# Altium PCB MiniEink 1.54寸墨水屏.PcbDoc
Units mil, origin at the board's own origin, x right, y up, seen from the top; angles counter-clockwise.
Board outline 1496.06 x 2362.2 mil, 2 copper layers (Top Layer, Bottom Layer), stack 65.792 mil thick; 102 components, 66 nets, 338 pads, 298 vias.
Unrouted connection lines stored in the file: 1.
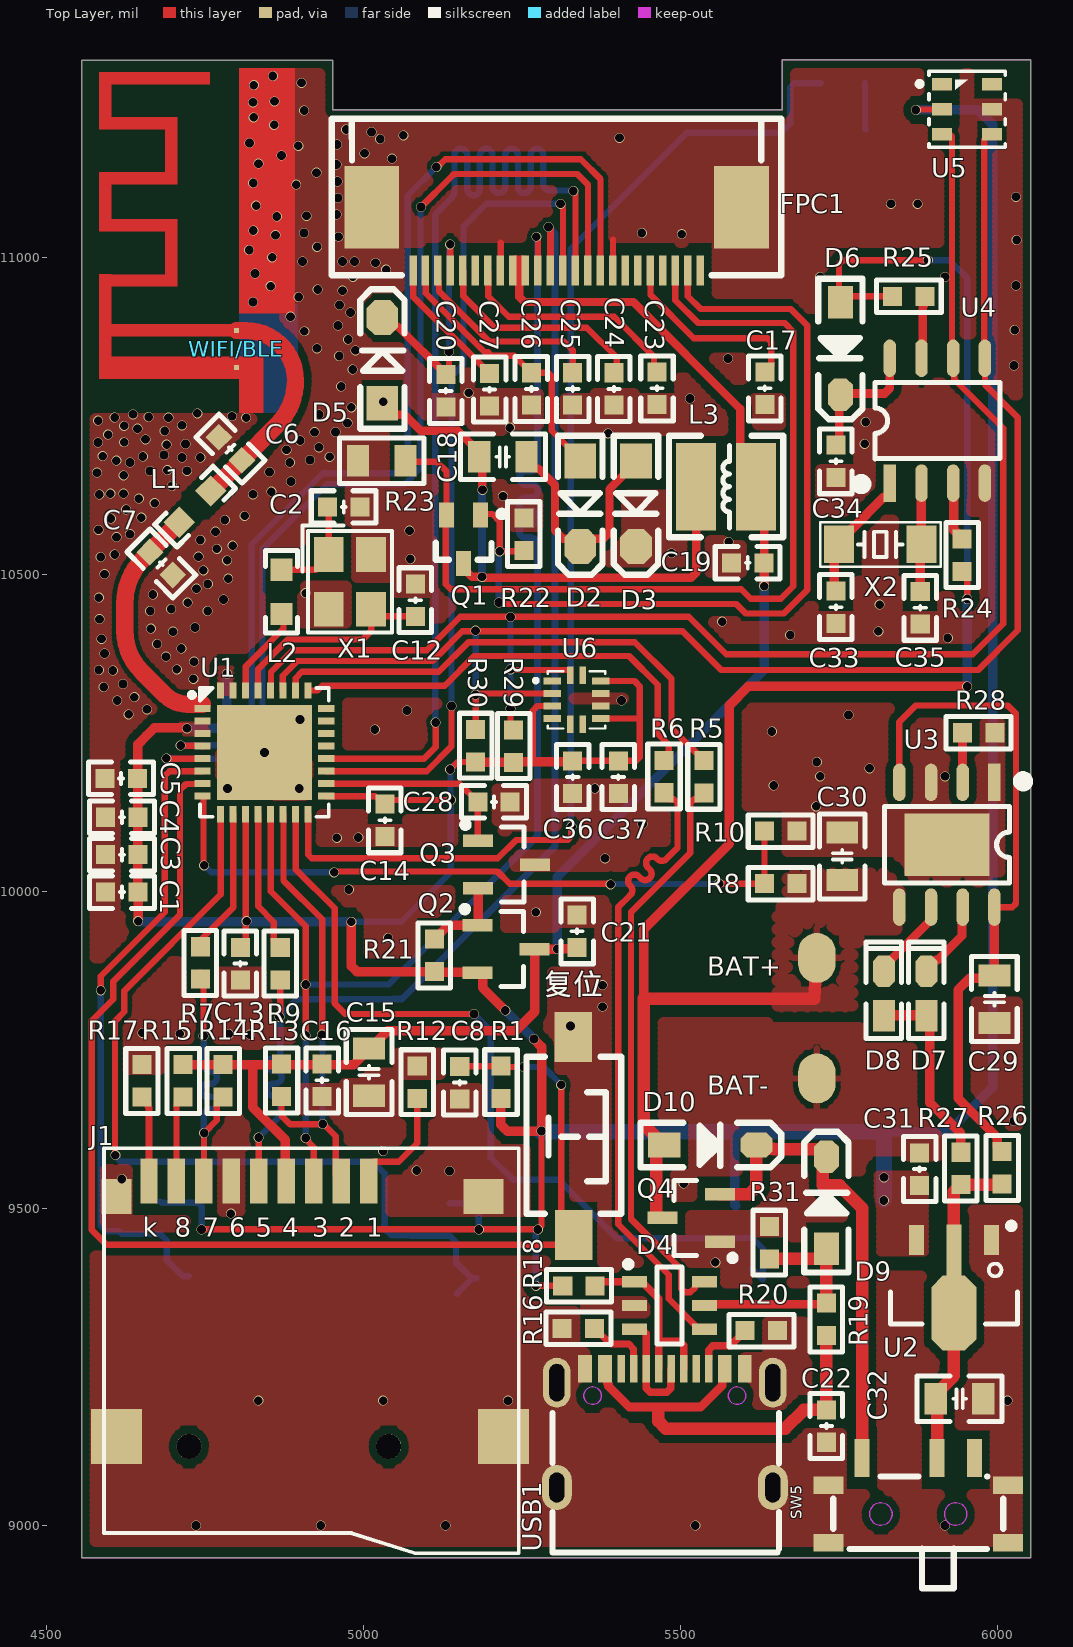
[diagram p0: Top Layer view]
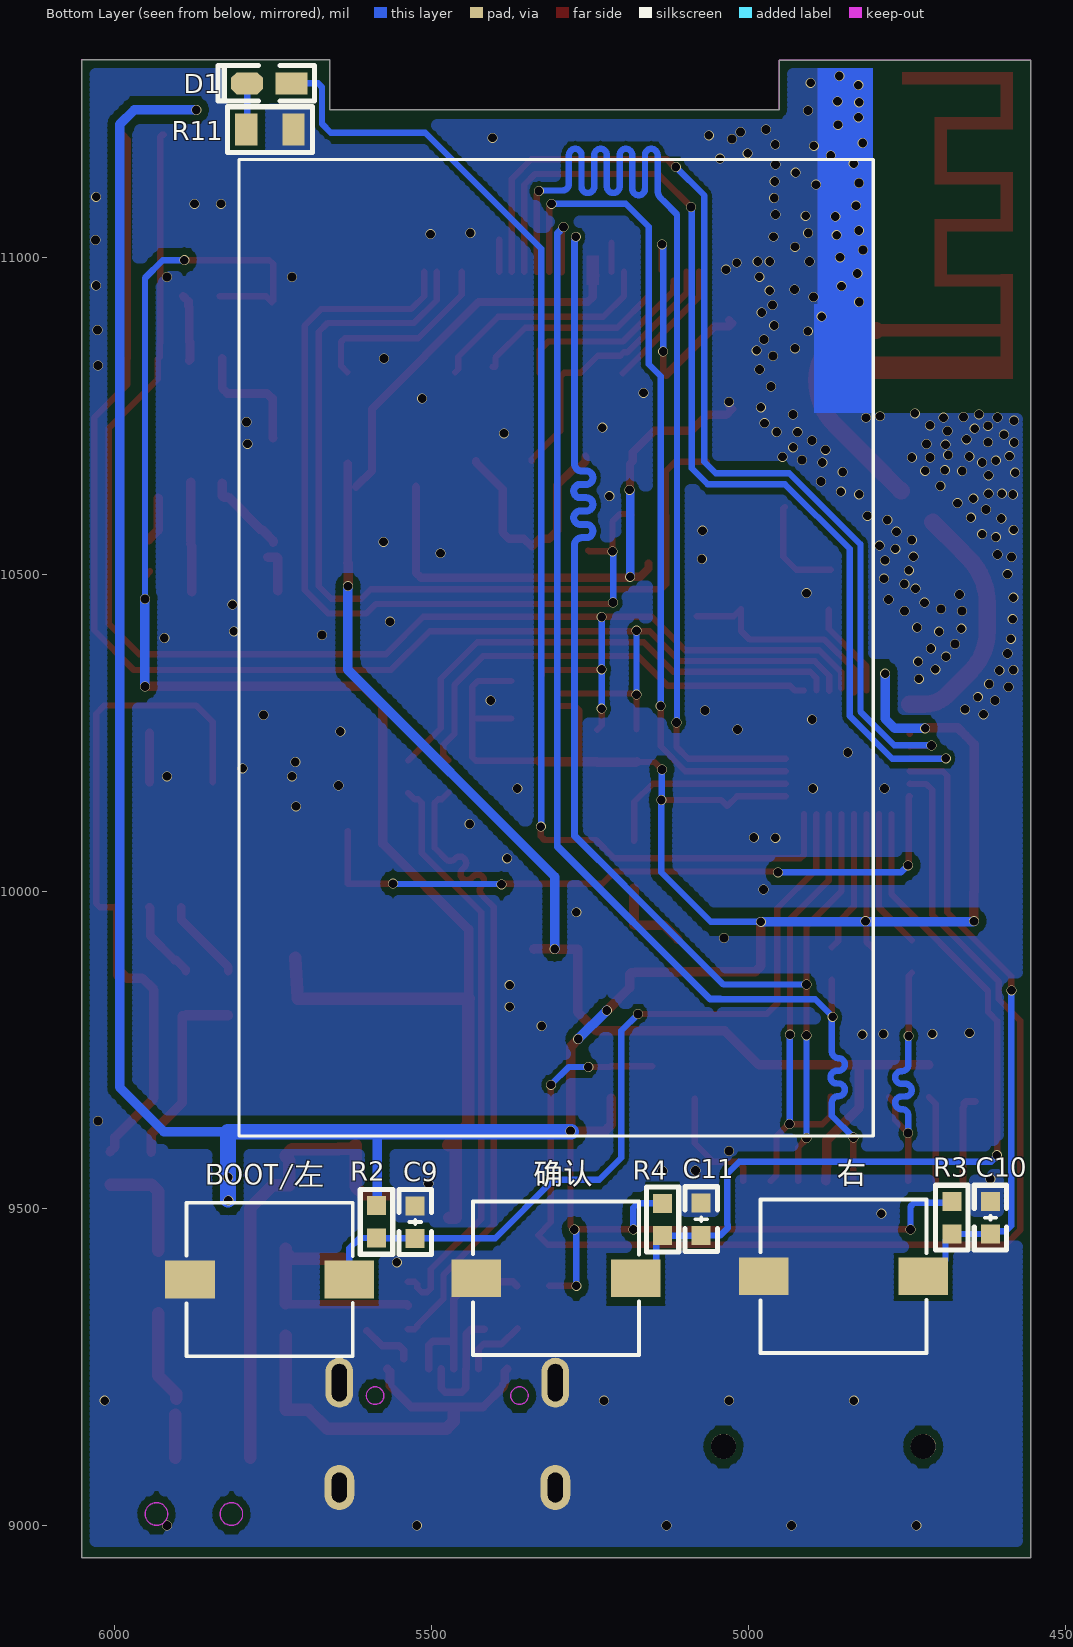
[diagram p1: Bottom Layer view, seen from below]
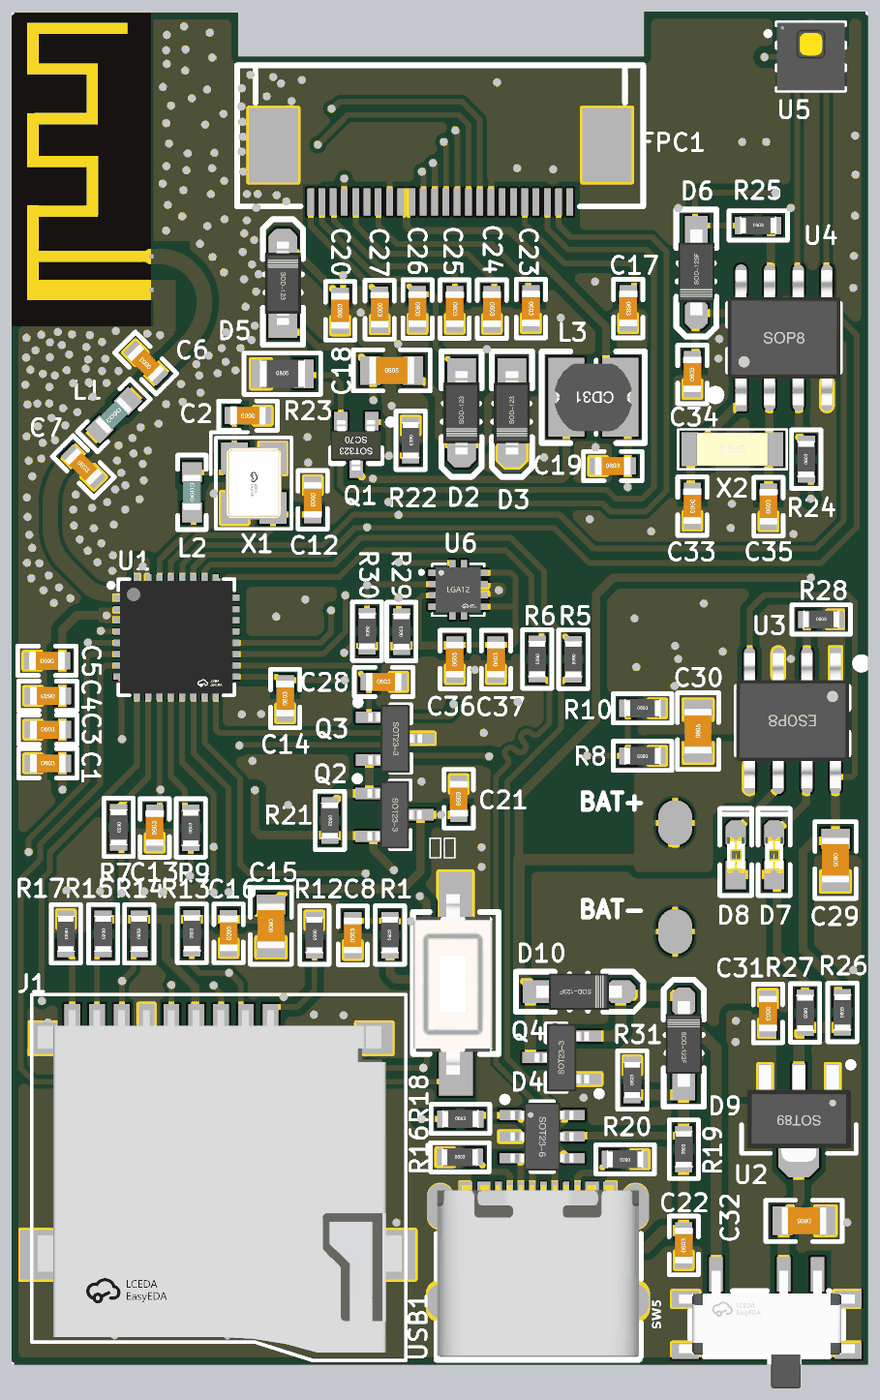
[diagram p2: 3D render of the assembled board from above, using the file's embedded part models]
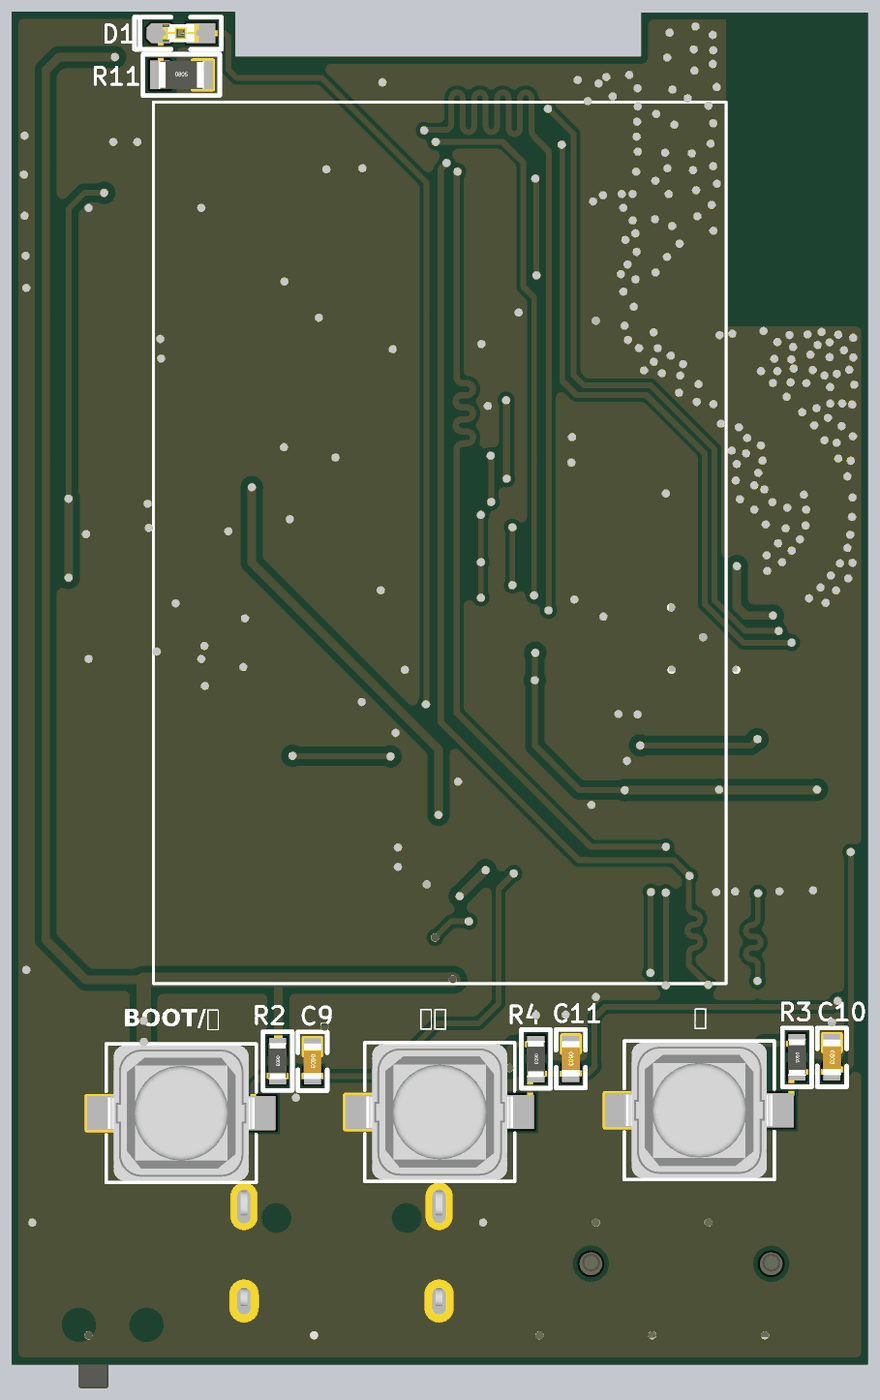
[diagram p3: 3D render of the assembled board from below, using the file's embedded part models]

## Layer stack, top to bottom
Top Solder: solder mask 0.4, Solder Resist, Dk 3.5
Top Layer: signal copper 1.4
Dielectric 1: dielectric 62.9921, FR-4, Dk 4.8
Bottom Layer: signal copper 1.4
Bottom Solder: solder mask 0.4, Solder Resist, Dk 3.5

## Board outline
4555.83,8949.06 4555.83,11310.08 4952.03,11310.08 4952.03,11232.52 5660.69,11232.52 5660.69,11311.26 6051.89,11311.26 6051.89,8949.06

## Design rules (kind name [scope] priority, off if disabled: settings)
Clearance fpc [InNetClass('fpc')] p1: gap=7 ignorepadtopadclearanceinfootprint=TRUE
Clearance usb [InNetClass('usb')] p2: gap=5 ignorepadtopadclearanceinfootprint=TRUE
Clearance esp32 [InNetClass('esp32-c3')] p3: gap=7 ignorepadtopadclearanceinfootprint=TRUE
Clearance typec [InNetClass('type c')] p4: gap=7.01 ignorepadtopadclearanceinfootprint=TRUE
Clearance [All] p5: gap=11.81 ignorepadtopadclearanceinfootprint=TRUE
DiffPairsRouting [InDifferentialPair('USB')] p1: maxlimit=10 minlimit=7 mostfreqgap=10 toplayer_minwidth=3.94 toplayer_maxwidth=15 toplayer_prefwidth=11.81 bottomlayer_minwidth=3.94 bottomlayer_maxwidth=15 bottomlayer_prefwidth=11.81 maxuncoupledlength=500
MatchedLengths [InDifferentialPair('USB')] p1: tolerance=5 checknetsindiffpair=FALSE checkdiffpairvsdiffpair=TRUE checkxsignals=TRUE checkothers=TRUE
PlaneConnect [All] p1: planeconnectstyle=Direct reliefexpansion=20 reliefentries=4 reliefconductorwidth=10 reliefairgap=10
PolygonConnect [All] p1: connectstyle=Direct reliefconductorwidth=10 reliefentries=4 polygonreliefangle="90 Angle" airgapwidth=10
RoutingVias [All] p1: holewidth=28 width=50 viastyle="Through Hole" minholewidth=28 minwidth=50 maxholewidth=28 maxwidth=50
SolderMaskExpansion [All] p1: expansion=4 istentingtop=FALSE
SupplyNets "Schematic Supply Nets_6" [InNet('E3V3')] p1: voltage=0.000
SupplyNets "Schematic Supply Nets_5" [InNet('VOUT')] p2: voltage=0.000
SupplyNets "Schematic Supply Nets_4" [InNet('BAT+')] p3: voltage=0.000
SupplyNets "Schematic Supply Nets_3" [InNet('3V3')] p4: voltage=0.000
SupplyNets "Schematic Supply Nets_2" [InNet('5V_OUT')] p5: voltage=0.000
SupplyNets "Schematic Supply Nets_1" [InNet('5V')] p6: voltage=0.000
SupplyNets "Schematic Supply Nets" [InNet('BAT-')] p7: voltage=0.000
Width [All] p1: maxlimit=78.74 minlimit=3.94 preferedwidth=10
28 further rules are at their usual default settings.

## Classes and differential pairs
net class usb: USB_D+ USB_D-
net class fpc: EPD_BUSY EPD_CS EPD_D/C EPD_RES GDR NetC17_1 NetC23_1 PREVGH PREVGL RESE SPI_MOSI SPI_SCLK VCOM
net class "tf card": E3V3 NetJ1_1 NetJ1_8 NetJ1_9 SPI_CS SPI_MISO SPI_MOSI SPI_SCLK
net class esp32-c3: BOOT EPD_BUSY EPD_CS EPD_D/C EPD_RES IIC_SCL IIC_SDA KEY3 KEY4 LED NetC7_1 NetC12_2 NetL2_1 RST SPI_3V3 SPI_CS SPI_MISO SPI_MOSI SPI_SCLK USB_D+ USB_D-
net class "type c": NetC18_2 NetC22_2 NetD4_1 NetD4_3 NetR16_2
component class 微雪1.54寸墨水屏1: BOOT/左 C1 C2 C3 C4 C5 C6 C7 C8 C9 C10 C11 C12 C13 C14 C16 C17 C19 C20 C22 C23 C24 C26 C28 C29 C31 C32 C33 C35 C37 D1 D2 D3 D4 D5 D6 D7 D8 D9 D10 FPC1 J1 L1 L2 L3 Q1 Q2 Q3 Q4 R1 R2 R3 R4 R5 R6 R7 R8 R9 R10 R11 R12 R13 R14 R15 R16 R17 R18 R19 R20 R21 R22 R23 R24 R25 R26 R27 R28 R29 R30 R31 SW5 U1 U2 U3 U4 U5 U6 USB1 WIFI/BLE X1 X2 右 复位 确认
differential pair USB_1: +NetR6_1 -NetR5_1
differential pair USB: +USB_D+ -USB_D-

## Components (designator, comment, footprint, x,y, rotation, side; value= is the part's Value field where it differs from the comment)
BOOT/左 "3x6x5" SW-SMD_L6.0-W6.0-LS6.6 5755.37,9388 r180 bottom (schematic designator SW2)
C1 "1uf/50V" "C 0603_L" 4619.41,9998.75 r0 top
C2 "20pF" "C 0603_L" 4969,10606 r180 top
C3 "0.1uf/50V" "C 0603_L" 4619.41,10057.75 r0 top
C4 "1uf/50V" "C 0603_L" 4619.41,10116.75 r180 top
C5 "0.1uf/50V" "C 0603_L" 4618,10178 r180 top
C6 "1pf" "C 0603_L" 4790.49,10697.84 r135 top
C7 "1pf" "C 0603_L" 4681.59,10516.82 r315 top
C8 "0.1uf/50V" "C 0603_L" 5152,9698.41 r90 top value=0.1uf
C9 "0.1uf/50V" "C 0603_L" 5526,9478.59 r270 bottom value=0.1uf
C10 "0.1uf/50V" "C 0603_L" 4619,9485.37 r270 bottom value=0.1uf
C11 "0.1uf/50V" "C 0603_L" 5075,9483 r270 bottom value=0.1uf
C12 "20pF" "C 0603_L" 5082,10459 r270 top
C13 "0.1uf/50V" "C 0603_L" 4806,9886 r90 top
C14 "0.1uf/50V" "C 0603_L" 5034,10112 r90 top
C15 "10uf/50V" "C 0805_L" 5009,9715 r270 top
C16 "0.1uf/50V" "C 0603_L" 4935,9702 r270 top
C17 "0.1uf/50V" "C 0603_L" 5633,10793 r270 top
C18 "104" "C 0805_L" 5220,10685 r0 top
C19 "0.1uf/50V" "C 0603_L" 5606,10518 r0 top
C20 "0.1uf/50V" "C 0603_L" 5130,10789 r90 top
C21 "0.1uf/50V" "C 0603_L" 5337,9937 r90 top
C22 "0.1uf/50V" "C 0603_L" 5730,9157 r90 top
C23 "0.1uf/50V" "C 0603_L" 5463,10793 r270 top
C24 "0.1uf/50V" "C 0603_L" 5395,10792 r270 top
C25 "0.1uf/50V" "C 0603_L" 5330,10792 r270 top
C26 "0.1uf/50V" "C 0603_L" 5265,10792 r270 top
C27 "0.1uf/50V" "C 0603_L" 5199,10791 r270 top
C28 "0.1uf/50V" "C 0603_L" 5206,10141 r0 top
C29 "10uf/50V" "C 0805_L" 5995,9830 r270 top
C30 "10uf/50V" "C 0805_L" 5755,10055.12 r90 top
C31 "0.1uf/50V" "C 0603_L" 5877,9562 r270 top
C32 "10uf/50V" "C 0805_L" 5940,9200 r180 top
C33 "12pF" "C 0603_L" 5745,10448 r270 top
C34 "0.1uf/50V" "C 0603_L" 5745,10678 r90 top
C35 "12pF" "C 0603_L" 5878,10447 r90 top
C36 "0.1uf" "C 0603_L" 5330,10180 r90 top
C37 "0.1uf" "C 0603_L" 5402,10180 r90 top
D1 "LED" "LED 0603R" 5756,11274 r0 bottom
D2 "MBR0530" SOD-123 5342,10611 r270 top
D3 "MBR0530" SOD-123 5430,10611 r270 top
D4 "USBLC6-2SC6" SOT23-6L 5482.57,9347.05 r270 top
D5 "MBR0530" SOD-123 5030,10837 r90 top
D6 "SS14" SOD-123F 5752,10856 r270 top
D7 "LED" "LED 0603R" 5888,9839 r90 top
D8 "LED" "LED 0603G" 5821,9839 r90 top
D9 "SS14" SOD-123F 5730,9509 r90 top
D10 "SS14" SOD-123F 5547,9600 r0 top
FPC1 "FPC-05F-24PH20" AFC07-S24ECA-00 5304.7,11028.8 r180 top
J1 "TF_Card" "Micro SD 3D" 4882.52,9125 r0 top
L1 "2nH" "L 0603" 4734.63,10606.63 r225 top
L2 "24nH" "L 0603" 4871,10472 r90 top
L3 "10uH" CD31 5572,10638 r180 top
Q1 "Si1308" SOT323 5158,10555 r180 top
Q2 "AO3401A" SOT23-3N 5225,9909 r270 top
Q3 "AO3400A" SOT23-3N 5226,10042 r270 top
Q4 "AO3401A" SOT23-3N 5517,9485 r90 top
R1 "10K" "R 0603_L" 5217,9699 r90 top value=1K
R2 "10K" "R 0603_L" 5587,9479 r270 bottom value=1K
R3 "10K" "R 0603_L" 4680,9485.37 r270 bottom value=1K
R4 "10K" "R 0603_L" 5136,9482.59 r270 bottom value=1K
R5 "22Ω" "R 0603_L" 5537,10180.59 r270 top
R6 "22Ω" "R 0603_L" 5474,10181 r270 top
R7 "22Ω" "R 0603_L" 4743,9887 r270 top
R8 "100K" "R 0603_L" 5658,10012 r180 top value=1K
R9 "22Ω" "R 0603_L" 4869,9886 r90 top
R10 "100K" "R 0603_L" 5658,10095 r0 top value=1K
R11 "1K" "R 0805_L" 5755,11201 r180 bottom
R12 "10K" "R 0603_L" 5085,9699 r270 top
R13 "10K" "R 0603_L" 4871,9702 r90 top
R14 "10K" "R 0603_L" 4779,9701 r90 top
R15 "10K" "R 0603_L" 4716,9701 r270 top
R16 "5.1K" "R 0603_L" 5339,9311 r0 top value=1K
R17 "10K" "R 0603_L" 4651,9701 r270 top
R18 "1.5K" "R 0603_L" 5340,9378 r0 top value=1K
R19 "0R" "R 0603_L" 5730,9325 r90 top value=1K
R20 "5.1K" "R 0603_L" 5627.55,9307.38 r180 top value=1K
R21 "10K" "R 0603_L" 5112,9899 r270 top
R22 "10K" "R 0603_L" 5253,10563 r270 top
R23 "3R" "R 0805_L" 5029,10679 r0 top
R24 "10K" "R 0603_L" 5944,10530 r90 top value=1K
R25 "10K" "R 0603_L" 5860,10938 r0 top value=1K
R26 "0.2R" "R 0603_L" 6007,9564 r90 top value=1K
R27 "1K" "R 0603_L" 5942,9563 r270 top
R28 "2K" "R 0603_L" 5970,10250 r0 top value=1K
R29 "4.7K" "R 0603_L" 5237,10229 r90 top value=1K
R30 "4.7K" "R 0603_L" 5177,10229.59 r270 top value=1K
R31 "10K" "R 0603_L" 5640,9446 r90 top value=1K
SW5 "MSK12C02" SW-TH_MSK12C02 5875,9040 r0 top
U1 "ESP32-C3FH4" QFN-32_L5.0-W5.0-P0.50-TL-EP3.7 4844,10219 r0 top
U2 "ht7833-a" SOT89_L 5931,9438 r180 top
U3 "TP4056" ESOP8_L 5920,10073.43 r270 top
U4 "BM8563ESA_C269877" SOP8_L 5905,10742 r90 top
U5 "AHT20" SENSOR-SMD_L3.0-W3.0-P1.00-BR 5952,11233 r180 top
U6 "SC7A20HTR" LGA-12_L2.0-W2.0-P0.50-TL 5336,10302 r0 top
USB1 "TYPE-C 16PIN 2MD(073)" USB-C-SMD_TYPE-C-16PIN-2MD-073 5475.3,9153.5 r0 top
WIFI/BLE "ANT2" (my)ANT-F-1-2.4G-1.6mmFR4-WCH 4800,10884 r270 top (schematic designator ANT1)
X1 "XL2EL89CPI-111YLC-40M" SMD3225-4P 4979,10488 r270 top
X2 "32.768kHz" "OSC 3215-2P" 5815,10547 r0 top
右 "3x6x5" SW-SMD_L6.0-W6.0-LS6.6 4850.63,9393 r180 bottom (schematic designator SW3)
复位 "3x6x5" "TSW SMD-3*6*2.5" 5332,9613 r270 top (schematic designator SW1)
确认 "3x6x5" SW-SMD_L6.0-W6.0-LS6.6 5304,9390 r180 bottom (schematic designator SW4)

## Footprints (in the part's own frame and the unit in brackets; to place one, negate y for a bottom-side part, rotate by r counter-clockwise, add the part's x,y. Pads: shape width x height; smd on the part's side, far side on the other; paste and mask are expansions set on the pad)
(my)ANT-F-1-2.4G-1.6mmFR4-WCH [mm]
  rect 0.2x0.2 smd mask+0: 0(1.483,0) 1(0,0)
  Top Layer region: -1.757,-2.361 -2.257,-2.361 -2.257,-5.181 -1.757,-5.181
  Top Layer region: -5.86,-2.361 -6.36,-2.361 -6.36,-5.181 -5.86,-5.181
  Top Layer region: -5.872,-2.361 -8.361,-2.361 -8.361,-2.861 -5.872,-2.861
  Top Layer region: -8.06,-2.361 -8.56,-2.361 -8.56,-5.181 -8.06,-5.181
  Top Layer region: -9.86,-1.06 -10.36,-1.06 -10.36,-5.18 -9.86,-5.18
  Top Layer region: -8.06,-5 -10.36,-5 -10.36,-5.5 -8.06,-5.5
  Top Layer region: -3.96,-5 -6.36,-5 -6.36,-5.5 -3.96,-5.5
  Top Layer region: -3.96,-2.36 -4.46,-2.36 -4.46,-5.18 -3.96,-5.18
  Top Layer region: -1.85,-2.36 -4.39,-2.36 -4.39,-2.855 -1.85,-2.855
  Top Layer region: 1.94,-5 -2.26,-5 -2.26,-5.5 1.94,-5.5
  Top Layer region: 1.94,0.1 1.04,0.1 1.04,-5.206 1.94,-5.206
  Top Layer region: 0.24,0.1 -0.26,0.1 -0.26,-5.231 0.24,-5.231
AFC07-S24ECA-00 [mil] "上接 抽屉式"
  rect 11.8x47.2 smd: 1(-226.3,49.8) 2(-206.6,49.8) 3(-186.9,49.8) 4(-167.3,49.8) 5(-147.6,49.8) 6(-127.9,49.8) 7(-108.2,49.8) 8(-88.5,49.8) 9(-68.8,49.8) 10(-49.2,49.8) 11(-29.5,49.8) 12(-9.8,49.8) 13(9.9,49.8) 14(29.6,49.8) 15(49.3,49.8) 16(69,49.8) 17(88.6,49.8) 18(108.3,49.8) 19(128,49.8) 20(147.7,49.8) 21(167.4,49.8) 22(187.1,49.8) 23(206.8,49.8) 24(226.4,49.8)
  rect 86.6x129.9 smd: 25(-291.3,-49.9) 26(291.4,-49.6)
  silkscreen extent -354,-189 354,58
"C 0603_L" [mil] "无极性贴片电容                                       淘宝ID:黄晶宝石"
  rect 30x30 smd: 1(-25.59,0) 2(25.59,0)
  silkscreen extent -51,-26 51,26, body extent -31,-16 31,16, height 32
"C 0805_L" [mil] "无极性贴片电容                                        淘宝ID:黄晶宝石"
  rect 35x50 smd: 1(-37.4,0) 2(37.4,0)
  silkscreen extent -67,-36 67,36, body extent -39,-24 39,24, height 20
CD31 [mm] "3.5*3*1mm（长宽高）        淘宝ID:黄晶宝石"
  rect 1.6x3.5 smd: 1(-1.2,0) 2(1.2,0)
  silkscreen extent -2.29,-2.03 2.29,2.03, body extent -1.72,-1.5 1.72,1.5, height 1.2
ESOP8_L [mm] "5*6*1.8mm（长宽高） 封装库来自淘宝卖家 ID：黄晶宝石"
  rect 1.5x0.5 smd: 1(-2.5,1.905)
  oval 1.5x0.5 smd: 2(-2.5,0.635) 3(-2.5,-0.635) 4(-2.5,-1.905) 5(2.5,-1.905) 6(2.5,-0.635) 7(2.5,0.635) 8(2.5,1.905)
  rect 2.5x3.4 smd paste-2: 9(0,0)
  rect 0.9x0.7 on Top Paste: 10(-0.625,1.1) 10(-0.625,0) 10(-0.625,-1.1) 11(0.65,1.1) 11(0.65,0) 11(0.65,-1.1)
  silkscreen extent -2.69,-2.5 1.52,3.2, body extent -3,-2.5 3,2.5, height 1.53
"L 0603" [mil] "小功率贴片电感        淘宝ID:黄晶宝石"
  rect 35x35 smd: 1(-35,0) 2(35,0)
  silkscreen extent -65,-25 65,25, body extent -31,-16 31,16, height 31
"LED 0603G" [mil] "绿色0603LED                                   淘宝ID:黄晶宝石"
  rect 50x35 smd: 1(-35,0.26)
  oct 50x35 smd: 2(35,0.26)
  silkscreen extent -71,-28 81,28, body extent -31,-16 32,16, height 18
"LED 0603R" [mil] "红色0603LED                                           淘宝ID:黄晶宝石"
  rect 50x35 smd: 1(-35,0.26)
  oct 50x35 smd: 2(35,0.26)
  silkscreen extent -71,-28 81,28, body extent -31,-16 31,16, height 24
LGA-12_L2.0-W2.0-P0.50-TL [mil]
  rect 27.6x11 smd: 1(-38.4,29.5) 2(-38.4,9.8) 3(-38.4,-9.9) 4(-38.4,-29.6) 7(38.4,-29.6) 8(38.4,-9.9) 9(38.4,9.8) 10(38.4,29.5)
  rect 11x27.6 smd: 5(-9.8,-38.4) 6(9.9,-38.4) 11(9.9,38.3) 12(-9.8,38.3)
  silkscreen extent -67,-45 46,45, body extent -39,-39 39,39, height 40
"Micro SD 3D" [mm] "淘宝ID:黄晶宝石"
  round 1 hole 1 unplated: 0(-4,0) 0(4,0)
  rect 0.7x1.8 smd: 1(3.2,10.627) 2(2.1,10.627) 3(1,10.627) 4(-0.1,10.627) 5(-1.2,10.627) 6(-2.3,10.627) 7(-3.4,10.627) 8(-4.5,10.627) 9(-5.6,10.627)
  rect 2.032x2.2 smd: 10(-6.9,0.4) 10(8.6,0.4)
  rect 1.2x1.4 smd: 10(-6.9,10)
  rect 1.6x1.4 smd: 10(7.8,10)
  silkscreen extent -7.4,-4.28 9.2,11.94, body extent -7.14,-3.95 9.01,11.25, height 2.05
"OSC 3215-2P" [mm] "3.2*1.5*0.6mm(长宽高)                      淘宝ID:黄晶宝石"
  rect 1.2x1.5 smd: 1(-1.65,0) 2(1.65,0)
  silkscreen extent -2.41,-0.89 2.41,0.89, body extent -1.6,-0.75 1.6,0.75, height 0.61
QFN-32_L5.0-W5.0-P0.50-TL-EP3.7 [mil]
  rect 25.6x11 smd paste-3937 mask+2: 1(-97.5,68.9) 2(-97.5,49.2) 3(-97.5,29.6) 4(-97.5,9.9) 5(-97.5,-9.8) 6(-97.5,-29.5) 7(-97.5,-49.2) 8(-97.5,-68.9) 17(97.5,-68.9) 18(97.5,-49.2) 19(97.5,-29.5) 20(97.5,-9.8) 21(97.5,9.9) 22(97.5,29.6) 23(97.5,49.2) 24(97.5,68.9)
  rect 11x25.6 smd paste-3937 mask+2: 9(-68.9,-97.5) 10(-49.2,-97.5) 11(-29.5,-97.5) 12(-9.8,-97.5) 13(9.8,-97.5) 14(29.5,-97.5) 15(49.2,-97.5) 16(68.9,-97.5) 25(68.9,97.6) 26(49.2,97.6) 27(29.5,97.6) 28(9.8,97.6) 29(-9.8,97.6) 30(-29.5,97.6) 31(-49.2,97.6) 32(-68.9,97.6)
  rect 149.6x149.6 smd paste-3937 mask+2: 33(0,0)
  silkscreen extent -118,-101 101,102, body extent -98,-98 98,98, height 36
"R 0603_L" [mil] "1/10W贴片电阻                 淘宝ID:黄晶宝石"
  rect 30x30 smd: 1(-25.59,0) 2(25.59,0)
  silkscreen extent -51,-26 51,26, body extent -31,-16 31,16, height 16
"R 0805_L" [mil] "1/8W贴片电阻"
  rect 35x50 smd: 1(-37.4,0) 2(37.4,0)
  silkscreen extent -67,-36 67,36, body extent -39,-25 39,25, height 20
SENSOR-SMD_L3.0-W3.0-P1.00-BR [mil]
  rect 31.5x19.7 smd paste+0 mask+2: 1(39.4,-39.4) 2(39.4,0) 3(39.4,39.4) 4(-39.4,39.4) 5(-39.4,0) 6(-39.4,-39.4)
  silkscreen extent -60,-60 79,60, body extent -59,-59 59,59, height 31
SMD3225-4P [mil]
  rect 55.1x47.2 smd: 1(-43.3,-33.5) 2(43.3,-33.5) 3(43.3,33.4) 4(-43.3,33.4)
  silkscreen extent -89,-75 80,66, body extent -63,-49 63,49, height 28
SOD-123 [mil] "2.7x1.6X1.1mm（长宽高，不包括引脚） 淘宝ID:黄晶宝石"
  rect 55x50 smd: 1(-67.5,0)
  oct 55x50 smd: 2(67.5,0)
  silkscreen extent -108,-35 112,35, body extent -73,-31 73,31, height 48
SOD-123F [mm] "2.7x1.6X1.1mm（长宽高，不包括引脚）"
  rect 1.3x1 smd: 1(-1.85,0)
  oct 1.3x1 smd: 2(1.85,0)
  silkscreen extent -2.79,-0.89 2.84,0.89, body extent -1.9,-0.8 1.9,0.8, height 1.15
SOP8_L [mm] "5*6*1.8mm（长宽高）封装库来自淘宝卖家 ID：黄晶宝石"
  rect 1.5x0.5 smd: 1(-2.5,1.905)
  oval 1.5x0.5 smd: 2(-2.5,0.635) 3(-2.5,-0.635) 4(-2.5,-1.905) 5(2.5,-1.905) 6(2.5,-0.635) 7(2.5,0.635) 8(2.5,1.905)
  silkscreen extent -2.69,-2.5 1.52,3.2, body extent -3,-2.5 3,2.5, height 1.9
SOT23-3N [mm] "3x1.3x1mm(长宽高)    封装库来自淘宝卖家 ID：黄晶宝石"
  rect 0.5x1.2 smd: 1(-0.95,-1.143) 2(0.95,-1.143) 3(0,1.143)
  silkscreen extent -1.72,-1.78 1.5,0.7, body extent -1.5,-1.2 1.5,1.2, height 1.05
SOT23-6L [mm] "3x1.6x1.1mm(长宽高) 封装库来自淘宝卖家 ID：黄晶宝石"
  rect 0.45x1 smd: 1(-0.95,-1.397) 2(0,-1.397) 3(0.95,-1.397) 4(0.95,1.397) 5(0,1.397) 6(-0.95,1.397)
  silkscreen extent -1.77,-1.78 1.55,0.51, body extent -1.5,-1.4 1.5,1.4, height 1.15
SOT89_L [mm] "4.6x4.3x1.6mm(长宽高)"
  rect 0.6x1.2 smd: 1(-1.5,-0.303) 3(1.5,-0.303)
  oct 1.8x3 smd: 2(0,2.616)
  rect 0.6x2.1 smd: 2(0,0.127)
  silkscreen extent -2.54,-1 2.54,3.05, body extent -2.3,-0.88 2.3,3.42, height 1.6
SOT323 [mm] "封装库来自淘宝卖家 ID：黄晶宝石"
  rect 0.6x1 smd: 1(-0.686,-0.965) 2(0.686,-0.965) 3(0,0.965)
  silkscreen extent -1.65,-1.14 1.12,0.81, body extent -1.09,-1.1 1.11,1.15, height 1.1
SW-SMD_L6.0-W6.0-LS6.6 [mil] "硅胶按键开关"
  rect 78.2x59.5 smd: 1(-125.7,0) 2(125.7,0)
  silkscreen extent -131,-121 131,121, body extent -128,-118 128,118, height 213
SW-TH_MSK12C02 [mil]
  rect 23.6x60 smd: 1(-88.6,66.9) 2(29.5,66.9) 3(88.5,66.9)
  rect 47.2x27.6 smd: 4(-141.8,-67) 4(-141.8,23.6) 4(141.7,-67) 4(141.7,23.6)
  Keep-Out Layer circle w0.1: c-59.1,-21.7 r17.7
  Keep-Out Layer circle w0.1: c59,-21.7 r17.7
  Keep-Out Layer region: -41.4,-21.7 -41.4,-25.22 -44.09,-31.73 -49.07,-36.71 -55.58,-39.4 -62.62,-39.4 -69.13,-36.71 -74.11,-31.73 -76.8,-25.22 -76.8,-21.7 -76.8,-18.18 -74.11,-11.67 -69.13,-6.69 -62.62,-4 -55.58,-4 -49.07,-6.69 -44.09,-11.67 -41.4,-18.18 -41.4,-21.7 -41.4,-21.7
  Keep-Out Layer region: -41.4,-21.7 -41.4,-25.22 -44.09,-31.73 -49.07,-36.71 -55.58,-39.4 -62.62,-39.4 -69.13,-36.71 -74.11,-31.73 -76.8,-25.22 -76.8,-21.7 -76.8,-18.18 -74.11,-11.67 -69.13,-6.69 -62.62,-4 -55.58,-4 -49.07,-6.69 -44.09,-11.67 -41.4,-18.18 -41.4,-21.7 -41.4,-21.7
  Keep-Out Layer region: 76.7,-21.7 76.7,-25.22 74.01,-31.73 69.03,-36.71 62.52,-39.4 55.48,-39.4 48.97,-36.71 43.99,-31.73 41.3,-25.22 41.3,-21.7 41.3,-18.18 43.99,-11.67 48.97,-6.69 55.48,-4 62.52,-4 69.03,-6.69 74.01,-11.67 76.7,-18.18 76.7,-21.7 76.7,-21.7
  Keep-Out Layer region: 76.7,-21.7 76.7,-25.22 74.01,-31.73 69.03,-36.71 62.52,-39.4 55.48,-39.4 48.97,-36.71 43.99,-31.73 41.3,-25.22 41.3,-21.7 41.3,-18.18 43.99,-11.67 48.97,-6.69 55.48,-4 62.52,-4 69.03,-6.69 74.01,-11.67 76.7,-18.18 76.7,-21.7 76.7,-21.7
  silkscreen extent -134,-139 134,37, body extent -154,-132 154,73, height 59
"TSW SMD-3*6*2.5" [mm] "3*6*2.5mm"
  rect 2x1.5 smd: 1(-3.996,-0.02) 2(3.937,0)
  silkscreen extent -3.21,-1.9 3.09,1.9, body extent -4,-1.88 4,1.62, height 2.59
USB-C-SMD_TYPE-C-16PIN-2MD-073 [mil]
  oval 47.2x70.9 hole 23.6 slot 47.2 at 90 deg paste-99999 mask+2: 13(-170.3,-93.5) 14(170.3,-93.5)
  oval 43.3x78.7 hole 23.6 slot 59.1 at 90 deg paste-99999 mask+2: 13(-170.3,71.8) 14(170.3,71.8)
  rect 21.7x43.3 smd paste-3937 mask+2: A1B12(-126,93.5) A4B9(-94.5,93.5) B1A12(126,93.5) B4A9(94.5,93.5)
  rect 11.8x43.3 smd paste-3937 mask+2: A5(-49.2,93.5) A6(-9.8,93.5) A7(9.8,93.5) A8(49.2,93.5) B5(68.9,93.5) B6(29.5,93.5) B7(-29.5,93.5) B8(-68.9,93.5)
  Keep-Out Layer circle w0.1: c113.8,51.4 r13.8
  Keep-Out Layer circle w0.1: c-113.8,51.4 r13.8
  Keep-Out Layer region: 127.6,51.4 127.6,48.66 125.5,43.58 121.62,39.7 116.54,37.6 111.05,37.6 105.98,39.7 102.1,43.58 100,48.66 100,51.4 100,54.14 102.1,59.22 105.98,63.1 111.05,65.2 116.54,65.2 121.62,63.1 125.5,59.22 127.6,54.14 127.6,51.4 127.6,51.4
  Keep-Out Layer region: 127.6,51.4 127.6,48.66 125.5,43.58 121.62,39.7 116.54,37.6 111.05,37.6 105.98,39.7 102.1,43.58 100,48.66 100,51.4 100,54.14 102.1,59.22 105.98,63.1 111.05,65.2 116.54,65.2 121.62,63.1 125.5,59.22 127.6,54.14 127.6,51.4 127.6,51.4
  Keep-Out Layer region: -100,51.4 -100,48.66 -102.1,43.58 -105.98,39.7 -111.06,37.6 -116.55,37.6 -121.62,39.7 -125.5,43.58 -127.6,48.66 -127.6,51.4 -127.6,54.14 -125.5,59.22 -121.62,63.1 -116.55,65.2 -111.06,65.2 -105.98,63.1 -102.1,59.22 -100,54.14 -100,51.4 -100,51.4
  Keep-Out Layer region: -100,51.4 -100,48.66 -102.1,43.58 -105.98,39.7 -111.06,37.6 -116.55,37.6 -121.62,39.7 -125.5,43.58 -127.6,48.66 -127.6,51.4 -127.6,54.14 -125.5,59.22 -121.62,63.1 -116.55,65.2 -111.06,65.2 -105.98,63.1 -102.1,59.22 -100,54.14 -100,51.4 -100,51.4
  silkscreen extent -177,-196 180,24, body extent -176,-189 176,109, height 127

## Part data
BOOT/左 右 复位 确认: library part "TSW 3x6", "30105201 3×6×2.5轻触开关（贴片加边带）", BOM名称=3x6轻触开关, 学习资源=https://shop463601444.taobao.com, 版权归属="封装库来自淘宝 ID：黄晶宝石"
C1 C3 C4 C5 C6 C7 C13 C14: library part CBB, "3010200396  (y)50V-474K电容/贴片/SMD0603", BOM名称=CBB电容, 淘宝ID="封装库来自淘宝 ID：黄晶宝石", 联系售后=https://shop463601444.taobao.com
C2 C12 C18 C33 C35 C36 C37: library part C, "贴片电容", BOM名称=无极性贴片电容, 唯一出售店铺网址=https://shop463601444.taobao.com, 淘宝ID="封装库来自淘宝 ID：黄晶宝石", 联系售后，技术支持=https://shop463601444.taobao.com
C8 C9 C10 C11: library part Capacitor, "Capacitor", SimulationGenericComponent=True
C15 C16 C17 C19 C20 C21 C22 C23 C24 C25 C26 C27 C28 C29 C30 C31 C34: library part CBB, "CBB电容", BOM名称=CBB电容, 淘宝ID="封装库来自淘宝 ID：黄晶宝石", 联系售后=https://shop463601444.taobao.com
C32: library part CBB, "3010200430 (y)25V-106K电容/贴片/SMD0603", BOM名称=CBB电容, 淘宝ID="封装库来自淘宝 ID：黄晶宝石", 联系售后=https://shop463601444.taobao.com
D1 D7 D8: "发光二极管", 技术支持，联系售后=https://shop463601444.taobao.com
D2 D3 D5: library part M7, "整流二极管", BOM名称=整流二极管, 学习资源=https://shop463601444.taobao.com, 版权归属="封装库来自淘宝 ID：黄晶宝石"
D6: "肖特基二极管", BOM名称=肖特基二极管, 封装库来自淘宝 ID：黄晶宝石=https://shop463601444.taobao.com, 属性=40V/1A
D9 D10: library part SS34, "肖特基二极管", BOM名称=肖特基二极管, 封装库来自淘宝 ID：黄晶宝石=https://shop463601444.taobao.com, 属性=40V/3A
J1: "TF卡座", BOM名称=TF卡座, 学习资源=https://shop463601444.taobao.com
L1 L2: library part L, "小功率贴片电感", BOM名称=小功率贴片电感, 封装库来自淘宝卖家 ID：黄晶宝石=其他店铺购入均为盗版，不享受售后技术支持服务，请立即申请退款, 淘宝ID="封装库来自淘宝 ID：黄晶宝石", 联系售后=https://shop463601444.taobao.com
L3: library part L-SMD, "CD系列贴片线绕功率电感", BOM名称=功率电感, 学习资源=www.ooocke.com, 淘宝ID="封装库来自淘宝 ID：黄晶宝石"
Q1: library part SI2302, "N沟道场效应管", BOM名称=N沟道场效应管, 学习资源=https://shop463601444.taobao.com, 技术支持，联系售后="封装库来自淘宝 ID：黄晶宝石"
Q2 Q4: library part SI2301, "P沟道场效应管", BOM名称=P沟道场效应管, 学习资源=https://shop463601444.taobao.com, 技术支持，联系售后="封装库来自淘宝 ID：黄晶宝石"
Q3: library part IRF840, "N沟场效应管", BOM名称=N沟场效应管, 技术支持，联系售后=https://shop463601444.taobao.com
R1 R2 R3 R4 R8 R10 R16 R18 R19 R20 R31: library part Res2, "电阻，SMD，1/8W", LatestRevisionDate=17-Jul-2002, LatestRevisionNote="Re-released for DXP Platform.", PackageReference=AXIAL-0.4, Published=8-Jun-2000, Publisher="Altium Limited", ROOM=手柄供电, 特殊要求=[无铅], 精度=5%
R5 R6 R7 R9 R11 R12 R13 R14 R15 R17 R21 R22 R23: library part R, "贴片电阻", BOM名称=贴片电阻, 封装库来自淘宝卖家 ID：黄晶宝石=其他店铺购入均为盗版，不享受售后技术支持服务，请立即申请退款, 版权归属="来自淘宝 ID：黄晶宝石", 联系售后=https://shop463601444.taobao.com
R24 R25 R26 R27: library part Res2, "30101352 (y)SMD0603  1/10W1MΩ电阻器（无铅）", LatestRevisionDate=17-Jul-2002, LatestRevisionNote="Re-released for DXP Platform.", PackageReference=AXIAL-0.4, Published=8-Jun-2000, Publisher="Altium Limited", ROOM=手柄供电, 特殊要求=[无铅], 精度=5%
R28 R29 R30: library part Res2, LatestRevisionDate=17-Jul-2002, LatestRevisionNote="Re-released for DXP Platform.", PackageReference=AXIAL-0.4, Published=8-Jun-2000, Publisher="Altium Limited", ROOM=手柄供电, 特殊要求=[无铅], 精度=5%
U2: "输出极性:正极;工作电压:12V;输出电压:3.3V;输出电流:450mA;电源纹波抑制比(PSRR):-;输出类型:固定;", JLCPCB Part Class="Extended Part", LCSC Part Name="3.3V 450mA 12V", Manufacturer=UMW(友台半导体), ManufacturerPart=HT7833-A, Operating Temperature=-25℃~+70℃@(Ta), Output Current=450mA, Output Voltage=3.3V, Power Supply Rejection Ratio (PSRR)=-, standby current=2uA, Voltage - Supply=12V, Voltage Dropout=90mV@(40mA), AddInBom=yes, ConvertToPcb=yes, Datasheet=https://item.szlcsc.com/datasheet/HT7833-A/323855.html, Features=热关断, FootprintName=SOT-89_L4.5-W2.5-P1.50-LS4.2-BR, ModelId=6db690b7897d4d18a30d90c1b89525ee, ModelName=SOT-89-3_L4.3-W2.5-H1.6-LS4.1-P1.50, ModelTransform=161.417,169.291,0,180,0,0,-12.745,0.006,0, Noise=-, Number of Outputs=1, Output Configuration=正极, Output Type=固定, Supplier=LCSC, Supplier Footprint=SOT-89, SupplierPart=C347195, Symbol=HT7833-A
U3: "锂电池充电管理"
U4: "高精度、低功耗 I2C 接口实时时钟/日历", Symbol=BM8563ESA_C269877
U5: library part AHT20_C2757850AHT20_C2757850, "AHT20温湿度传感器"
U6: "±2G/±4G/±8G/±16G三轴微机械数字加速度计"
WIFI/BLE: "PCB板载天线带馈线"
X1: "SMD3225-4P", Symbol=XL2EL89CPI-111YLC-40M
X2: library part XTAL-2P, "2脚无源脚晶振", BOM名称=2脚无源脚晶振, 学习资源=https://shop463601444.taobao.com, 版权归属="封装库来自淘宝卖家 ID：黄晶宝石"
D4: Symbol=USBLC6-2SC6
FPC1: Symbol=FPC-05F-24PH20
SW5: Symbol=MSK12C02
U1: Symbol=ESP32-C3FH4
USB1: Symbol="TYPE-C 16PIN 2MD(073)"

## Free pads (board coordinates)
  oval 59.06x78.74 smd: 2(5715,9705) 2(5715,9895)

## Via types
v1: diameter 15.75, hole 13.78, Top Layer to Bottom Layer, tented both sides, 298 vias

## Nets (pads, with @x,y where several pads share a name; then routed paths per layer and width w, separated by ;. In a path a pad name is that pad's centre, name@x,y a point inside that pad or via, vN(x,y) a via of type N, cw(c..) or ccw(c..) an arc to the next point about the centre after c; other vN are vias at no path point)
3V3: C1.2 C3.2 C4.1 C5.1 C13.2 C14.2 C31.2 C36.2 C37.2 Q2.2 R1.1 R2.1 R3.1 R4.1 R18.1 R21.2 R29.1 R30.2 U1.2 U1.3 U1.11 U1.17 U1.31 U1.32 U2.3 U5.2 U6.3 U6.7 U6.10 | length 6618.9
  Top Layer w10: v1(4745,9467) v1(5182,9467) v1(5275.14,9467) 5281,9472.86 v1(5281,9622) ; U1.3@4746.24,10248.86 U1.3 ; C13.2 4814.5,9920.08 U1.11 ; U1.17 5018.49,10150.1 5034,10134.59 5043.42,10144 v1(5138,10144) ; v1(5137,10192) 5149,10204 R30.2 ; 5266.99,10204.5 5266.99,10284.86 5274.23,10292.1 U6.3 ; v1(5272,9378) R18.1 ; C36.2 5374.98,10205.59 ; 5374.4,10206.17 5374.98,10205.59 ; U6.7 5435.17,10272.4 5436,10273.23 ; U6.10 5427.5,10331.5 5436,10323 5436,10273.23 ; v1(5871,11232) 5871.5,11232.5 5912.1,11232.5 U5.2 ; 5374.98,10205.59 C37.2 5430.14,10205.59 5436,10211.45 5436,10273.23
  Top Layer w15: C1.2@4644.59,9998.75 4644.59,10129 4644.59,10188 4644.59,10212.81 4644.59,10231.77 4658,10245.17 4670.36,10257.53 4690.73,10257.53 ; v1(4645,9953) C1.2 ; 4690.75,10257.52 4721.48,10257.52 v1(4722,10257) ; v1(4981,9952) 4981,9882.2 4989.79,9873.41 R21.2 5112.9,9872.51 5179.09,9872.51 Q2.2 5185.61,9871.6 5187.96,9869.26 5187.96,9848.04 v1(5223.78,9812.22) ; R30.2 5177.3,10203.7 5238.71,10203.7 5239,10203.41 5240.09,10204.5 5266.99,10204.5 5328.91,10204.5 C36.2 ; R1.1 5217,9632 5222.01,9626.99 5227,9622 v1(5281,9622) 5281,9754.8 5269,9766.8 v1(5269,9767)
  Bottom Layer w10: R3.1 4681.97,9509 4739.14,9509 4745,9503.14 v1(4745,9467) ; v1(4981,9952) 5060,9952 5138,10030 v1(5138,10144) 5137.5,10144.5 5137.5,10191.5 v1(5137,10192) ; R4.1 5174.82,9508.18 5182,9501 v1(5182,9467) v1@5182.87,9466.13 ; v1(5272,9378) 5272,9462.3 5275.14,9465.44 v1(5275.14,9467)
  Bottom Layer w15: v1(4645,9953) 4645.2,9953 4646.2,9952 v1(4981,9952) ; v1(4722,10257) 4770,10257 4785,10272 v1(4785,10343.08) ; v1(5223.78,9812.22) v1(5269,9767) ; 5585.69,9621 5585.69,9505.9 R2.1 ; 5821,9621 5922,9621 5992,9691 5992,11209 5969,11232 v1(5871,11232)
  Bottom Layer w25: v1@5280,9621 5585.69,9621 5821,9621 v1@5821,9514
  other v1: 5820.59,9512.46 5821,9549.12 4816,9953
5V: D4.5 D9.1 R19.2 R31.1 | length 378.3
  Top Layer w13.78: D4.5 5539.34,9348.82 5728.23,9348.82 R19.2
  Top Layer w19.68: R31.1 5714.24,9420.41 5720.16,9420.42 5730,9430.26 D9.1 ; R19.2 D9.1@5730,9435
5V_OUT: D9.2 D10.2 Q4.2 SW5.1 | length 757.9
  Top Layer w19.68: Q4.2 5608.3,9522.4 5619.83,9533.93 D10.2 5625.6,9594.23 5646.39,9594.23 5647.11,9593.51 5720.16,9593.51 5730,9583.66 D9.2 ; D9.2@5724.23,9576.07 5724.23,9536.23 5750.77,9536.23 5786.4,9500.6 SW5.1
ADC1_CH3: R8.2 R10.1 U1.8 | length 1091
  Top Layer w10: U1.8 4747.4,10150.1 4747.9,10149.6 4747.9,10042.1 v1(4749,10041) ; v1(4954,10030) 4955.1,10031.1 4959.16,10031.1 4959.32,10031.25 5211.59,10031.25 5230.84,10012 5389,10012 v1(5390,10011) ; v1(5561,10012) R8.2 R10.1
  Bottom Layer w10: v1(4749,10041) 4760,10030 v1(4954,10030) ; v1(5390,10011) 5390.5,10011.5 5560.5,10011.5 v1(5561,10012)
BAT+: C30.1 D6.1 D10.1 pad.2@5715,9895 Q4.3 R8.1 R24.1 R25.1 U3.5 | length 2672
  Top Layer w10: R25.1 5761.16,10938 D6.1 5750,10930.83 5750,10989.14 5755.86,10995 v1(5890,10995) ; R24.1 5952,10496.41 v1(5952,10461)
  Top Layer w15: 5441.83,9831.17 5441.83,9939.83 5577,10075 5577,10293.21 5606.79,10323 v1(5952,10323)
  Top Layer w19.68: 5441.83,9831.17 5442.06,9830.94 ; D10.1@5462,9609.84 5462,9485 Q4.3 ; D10.1 5442.06,9632.11 5442.06,9830.94 ; pad.2@5715,9895 5711.06,9830.94 5442.06,9830.94
  Bottom Layer w10: v1(5890,10995) 5924,10995 5952,10967 v1(5952,10461)
  Bottom Layer w15: v1(5952,10323) v1(5952,10461)
BAT-: BOOT/左.1 C1.1 C2.1 C3.1 C4.2 C5.2 C6.2 C7.2 C8.1 C9.1 C10.1 C11.1 C12.1 C13.1 C14.1 C15.2 C16.2 C17.2 C19.1 C20.1 C21.2 C22.1 C23.2 C24.2 C25.2 C26.2 C27.2 C28.2 C29.2 C30.2 C31.1 C32.1 C33.2 C34.1 C35.1 C36.1 C37.1 D3.2 D4.2 FPC1.8 FPC1.17 FPC1.25 FPC1.26 J1.6 J1.10 pad.2@5715,9705 Q3.3 Q4.1 R10.2 R11.2 R12.1 R16.1 R17.1 R20.1 R22.1 R23.1 R28.2 R31.2 SW5.4 U1.33 U2.1 U3.1 U3.3 U3.9 U4.4 U5.5 U6.8 U6.9 USB1.13 USB1.14 USB1.A1B12 USB1.B1A12 WIFI/BLE.0 X1.2 X1.4 右.1 复位.1 确认.1 | length 96.8
  Top Layer w10: FPC1.17@5216.42,10976.69 5216.42,11022.58 ; FPC1.8@5393.58,10976.69 5393.58,11027.58
  other v1: 4735.99,9000.12 4932.84,9000.12 5129.69,9000.12 5523.39,9000.12 5917.09,9000.12 4834.42,9196.97 5031.27,9196.97 5228.12,9196.97 6015.52,9196.97 5555,9415 4791.05,9491.73 5505,9539 4619.22,9546.26 5136,9559 5084,9560 5031.27,9590.67 6026,9638 4821,9774 4710.64,9775.33 4788,9775 4652,9777 5326.54,9787.52 5377,9818 5377,9852 5039.13,9926.32 5272,9967 4977,10003 5381,10052 4958.24,10084.33 4992,10085 5440,10106 5714,10134 4786,10162 4899,10162 5365,10162 5647,10167 5720.24,10181.22 5917.09,10181.22 5798,10194 5715,10204 4844,10219 5644,10252 5018,10255 4900,10271 5765,10278 4630,10279 5069,10285 4659,10287 4612,10301 5407,10301 4639,10306 4590.54,10321.96 4621,10327 4732,10335 4605,10348 4583,10349 4706,10350 4733,10362 4689,10370 4592,10375 4713,10383 4675,10390 4587,10398 5921.53,10399.21 5673,10404 4699.89,10409.34 5812,10410 4665,10414 4734.58,10415.97 5565.74,10425.13 4584,10429 4664,10442 4754.58,10441.97 4697,10445 5814,10452 4723,10455 4779.58,10459.97 4583,10463 4668,10468 4909,10470 4737.01,10477.18 4754.78,10484.47 4787,10493 4592,10500 4747.79,10506.02 4785.25,10521.82 5074,10524 4585.87,10527.11 4740.22,10527.58 4608,10531 5486,10533 4769,10540 4794,10545 5576,10551 4743,10554 4610.63,10558.42 4632,10563 4767,10567 5072.9,10568.56 4582.33,10569.93 4781.58,10585.54 4601.93,10587.67 4650,10589 4813,10592 4626,10602 4671,10612 4646,10619 5220,10623 4583.73,10625.47 4826,10626 4601,10627 4622,10627 4855,10630 4698,10639 4886,10646 4622.18,10655.79 4580,10660 4852,10661 4663.59,10662.75 4722,10663 4691,10664 4632,10676 4884,10676 4610.58,10679 4916,10680 4714.28,10684.03 4743,10684 4947,10685 4589,10686 4652.37,10685.58 4685.64,10687.9 4879,10696 4930,10700 4689.9,10704.15 4719.69,10705.32 5790.36,10705.59 4581.56,10707.64 4623,10708 4900.42,10710.8 4656.62,10712.67 4597.81,10720.02 5386,10722 4923.14,10723.9 4956,10724 4686.8,10725.82 4643.85,10729.31 5231,10731 4623,10734 4714.28,10734.72 4975.16,10738.13 5792,10740 4582,10742 4607.87,10747.1 4692.99,10746.72 4815.36,10746.62 4661.65,10747.88 4793,10749 4637,10752 4930.42,10751.58 4738.27,10753.68 4981,10763 5031.27,10771.77 5515,10777 5166,10786 4965,10796 4983.15,10822.65 6026,10829 5575,10840 4962,10844 4987.51,10852.94 4927,10856 4976,10870 4907,10883 6027,10885 4960,10892 4885,10906 4979.65,10912.66 4962.46,10924.31 4826,10929 4898,10937 4967,10947 4928,10949 4854,10954 6029,10955 4983.44,10968.87 5720.24,10968.62 5917.09,10968.62 4829,10974 5036,10980 5019,10991 4904.14,10992.94 4967,10993 4986,10993 4856.26,10999.58 4820,11011 4927.3,11016.1 6030,11027 4961,11032 4861.43,11034.46 5502,11036 4906.43,11038 5439,11038 4826.55,11041.78 4863.67,11063.95 4910.25,11064.97 4958,11067 4831,11081 5832,11084 5874,11084 4960,11093 6029,11095 4894.22,11114.09 4826.26,11116.64 4959.24,11119.18 4926.03,11132.93 4957.84,11145.82 4834.66,11147.18 5045.23,11155.16 4870.8,11160.16 5001.77,11163.58 4897.52,11175.43 4958.31,11177.59 4820.4,11179.76 5026.54,11186.01 5404,11188 5063,11192 5012.98,11197.22 4973,11201 4859.35,11208.52 4827.02,11220.23 4906.69,11231.17 4826,11243.9 4860.11,11245.43 4827.28,11270.88 4902.36,11274.7 4857.31,11285.39
BOOT: BOOT/左.2 C9.2 R2.2 U1.15 | length 1349.1
  Top Layer w10: U1.15 4893.7,10121 4893.7,10034.3 4954.91,9973.09 4954.91,9823.09 4971.51,9806.49 v1(5174.51,9806.49)
  Bottom Layer w10: v1(5174.51,9806.49) 5201,9780 5201,9580 5236,9545 5308,9545 5400,9453 C9.2 5586.59,9453 R2.2 5613.59,9453.41 5617,9450 5629.67,9437.33 BOOT/左.2 BOOT/左.2@5612.86,9404.81
E3V3: C15.1 C16.1 C19.2 C21.1 FPC1.15 FPC1.16 J1.4 L3.1 Q2.3 R13.2 R14.2 R15.1 | length 2452.2
  Top Layer w13: 5242.01,10970.79 5245.95,10966.85 5245.95,10937.05 5254,10929 5426,10929 5594.25,10760.75 5594.25,10663 L3.1 ; C19.2@5632.24,10517.93 L3.1@5632.24,10674.4
  Top Layer w15: R15.1 4825.58,9726.59 ; J1.4 4877,9571.32 4877,9608 4825.58,9659.42 4825.58,9726.59 ; v1@5306,9908.7 5270.3,9908.7 Q2.3 5270,9810 5240,9780 5038,9780 4984.59,9726.59 4825.58,9726.59 ; v1(5306,9909) 5306.14,9909.14 5339.27,9909.14 C21.1@5339.41,9909 ; v1(5632,10481) 5631.86,10481.14 5631.86,10517.55 C19.2@5632.24,10517.93
  Bottom Layer w15: v1(5306,9909) 5306,10023 5632,10349 v1(5632,10481)
EPD_BUSY: FPC1.9 U1.4 | length 1639.2
  Top Layer w10: v1(4712,10230.06) 4712.66,10229.4 4746,10229.4 U1.4 ; v1(5115,11142) 5117.09,11142 5129.09,11154 5343,11154 5373.9,11123.1 FPC1.9@5373.9,10976.69
  Bottom Layer w10: v1(4712,10230.06) 4770.64,10230.06 4824,10283.42 4824,10547 4936,10659 5052,10659 5070.14,10677.14 5070.14,11097.14 v1(5115,11142)
EPD_CS: FPC1.12 U1.19 | length 1317.8
  Top Layer w10: U1.19 5099.99,10189.5 5139,10228.51 v1(5139,10292) ; v1(5311,11084) 5311,11081.91 5314.84,11078.07 FPC1.12@5314.84,10976.69
  Bottom Layer w10: v1(5139,10292) 5139,10812 5158,10831 5158,11048 5194,11084 v1(5311,11084)
EPD_D/C: FPC1.11 U1.20 | length 1877.1
  Top Layer w10: U1.20 5095.64,10209.2 5114,10227.56 v1(5114,10266) ; v1(5331,11104) 5331,11101.91 5334.53,11098.38 FPC1.11@5334.53,10976.69
  Bottom Layer w10: v1(5114,10266) 5114,10267.8 5113.14,10268.66 5113.14,11067.14 5133.73,11087.73 5138.73,11092.73 ccw(c5126.66,11104.8) 5143.73,11104.8 5143.73,11160.53 cw(c5153.73,11160.53) 5163.73,11160.53 5163.73,11107.54 ccw(c5173.73,11107.54) 5183.73,11107.54 5183.73,11160.53 cw(c5193.73,11160.53) 5203.73,11160.53 5203.73,11111 ccw(c5213.73,11111) 5223.73,11111 5223.73,11160.53 cw(c5233.73,11160.53) 5243.73,11160.53 5243.73,11111 ccw(c5253.73,11111) 5263.73,11111 5263.73,11160.53 cw(c5273.73,11160.53) 5283.73,11160.53 5283.73,11115 ccw(c5293.73,11115) 5293.73,11105 5327.19,11105 5330,11105 v1(5331,11104)
EPD_RES: FPC1.10 U1.5 | length 1644.5
  Top Layer w10: v1@4689,10210 ccw(c4690.93,10211.93) 4690.93,10209.2 U1.5 ; v1(5091,11079) 5137,11125 5137,11125.14 5142.86,11131 5337,11131 5354.21,11113.79 FPC1.10@5354.21,10976.69
  Bottom Layer w10: v1@4689,10210 4689.8,10209.2 4773.82,10209.2 4841,10276.38 4841,10539.96 4943.04,10642 5065,10642 5090,10667 5090,11078 v1(5091,11079)
  other v1: 4689.4,10209.6
GDR: FPC1.2 Q1.1 R22.2 | length 1374.4
  Top Layer w10: Q1.1 5187,10595 5203,10595 5215,10583 v1(5215,10536) 5251.58,10536 R22.2 ; v1(5214,10455.24) 5216.24,10453 5588,10453 5603.06,10437.94 5662.94,10437.94 5700,10475 5700,10892 5674,10918 5532,10918 5511.69,10938.31 FPC1.2@5511.69,10976.69
  Bottom Layer w10: v1(5214,10455.24) 5213.5,10455.74 5213.5,10531.5 5213.9,10531.9 5213.9,10534.9 v1(5215,10536)
IIC_SCL: R29.2 U1.28 U4.6 U5.3 U6.12 | length 2351.4
  Top Layer w10: U1.28@4854,10320 4854.3,10320.3 4854.3,10345.34 4888.96,10380 5100,10380 5153,10433 5513,10433 5572,10374 5961,10374 6009,10422 6009,10730 5931.7,10807.3 5931.7,10838.73 U4.6 ; v1(5232,10288) 5232,10261.59 R29.2@5239,10254.59 ; v1(5232,10350.02) 5233.02,10349 5325.7,10349 5326.2,10348.5 U6.12 ; U5.3@5922.2,11193 5925.14,11193 5928.1,11190.04 5928.1,10863.61 5928.87,10862.84 U4.6@5928.87,10841.99
  Bottom Layer w10: v1(5232,10288) v1(5232,10432.62)
IIC_SDA: R30.1 U1.27 U4.5 U5.4 U6.2 | length 2349.6
  Top Layer w10: U1.27@4873,10316 4873,10340 4896,10363 5109,10363 5156,10410 5503.27,10410 5564.27,10349 5964.58,10349 5969.54,10349 6032,10411.46 6032,10747 5980,10799 U4.5 ; R30.1 v1(5177,10310) 5178.1,10311.1 5184.66,10311.1 5185.36,10311.8 U6.2@5295.4,10311.8 ; U4.5@5979,10840.6 5979,11185.1 5986.5,11192.6 U5.4@5992.4,11192.6
  Bottom Layer w10: v1(5177,10310) v1(5177,10411)
KEY3: C10.2 R3.2 U1.6 右.2 | length 1003.8
  Top Layer w10: v1(4586,9844) 4586,9865.89 4687.1,9967 4687.1,10182.1 4694.5,10189.5 U1.6
  Bottom Layer w10: v1(4586,9844) 4586,9473 4594.86,9464.14 4614.65,9464.14 C10.2 R3.2 4690,9449.78 4690,9418.58 4715.58,9393 右.2
KEY4: C11.2 R4.2 U1.9 确认.2 | length 1369.2
  Top Layer w10: v1(4609,9584) 4608.42,9584.58 4608.42,9795.42 4622.87,9809.87 4622.87,9842.87 4775.1,9995.1 U1.9
  Bottom Layer w10: v1(4609,9584) 4609,9582.44 4611.87,9579.57 4617.73,9573.67 5015.33,9573.67 5034,9555 5034,9475 5033.14,9474.14 5033.14,9469.27 5045,9457.41 C11.2 5075.42,9457 R4.2 5146,9447 5146,9414.75 5170.75,9390 确认.2 5171.75,9390 确认.2@5147,9365.25
LED: D1.1 U1.16 | length 1956.7
  Top Layer w10: U1.16 4912.9,10057.86 4918.76,10052 5212,10052 5241,10081 5322.14,10081 5328,10086.86 v1(5328,10102)
  Bottom Layer w10: v1@5327,10103 5327,11013 5510,11196 5659,11196 5672.94,11209.94 5672.94,11267.88 5678.8,11273.74 D1.1
NetANT1_1: C6.1 L1.1 WIFI/BLE.1 | length 363.4
  Top Layer w27.2: L1.1 ccw(c4759.37,10633.4) 4760.81,10631.97 C6.1 4863.71,10734.87 ccw(c4793,10805.58) 4893,10805.58 ccw(c4814.58,10805.58) 4814.58,10884 WIFI/BLE.1
NetC2_2: C2.2 L2.2 X1.1 | length 162.4
  Top Layer w10: L2.2 4925.15,10507 4945.5,10527.35 X1.1 4945.5,10603.92 C2.2
NetC7_1: C7.1 L1.2 U1.1 | length 388.8
  Top Layer w27.2: L1.2 4663.9,10535.9 ccw(c4664.88,10534.92) C7.1 4653.29,10524.72 ccw(c4724,10454) 4624,10454 4624,10411 ccw(c4715.74,10411) 4650.87,10346.13 4687.15,10309.85 ccw(c4723,10345.7) 4723,10295 4746.5,10295
NetC12_2: C12.2 U1.29 X1.3 | length 348.3
  Top Layer w10: U1.29@4834,10313.69 4834,10350 4881,10397 4999,10397 5012.4,10410.4 X1.3 5023.69,10433.41 C12.2
NetC17_1: C17.1 FPC1.5 | length 309.1
  Top Layer w10: FPC1.5@5452.64,10976.69 5452.64,10940.36 5521,10872 5637.14,10872 5643,10866.14 5643,10834.45 5643,10828.59 C17.1
NetC18_1: C18.1 D5.1 L3.2 Q1.3 | length 909.4
  Top Layer w13: D5.1@5031,10765.5 5026.08,10760.58 5035.45,10751.21 5065.79,10751.21 5091,10726 5149.09,10726 5183,10692.09 5183,10678.59 5182.8,10678.39 5187.47,10673.71 5187.47,10633.53 v1(5188,10633) ; Q1.3 5158,10509.13 5171.25,10495.87 v1@5186.26,10495.87 ; v1(5187,10495.87) 5187.74,10495.87 5189.12,10494.5 5517.14,10494.5 5524.76,10502.12 L3.2
  Bottom Layer w13: v1@5187,10496.62 5187,10631.26 5188,10632.26 v1(5188,10633)
NetC18_2: C18.2 D2.2 D3.1 | length 374.6
  Top Layer w13: C18.2 5257.4,10677.5 5268.4,10666.5 5275.9,10666.5 5302,10640.4 5302,10569 5315.19,10555.81 5329.69,10555.81 D2.2 5354.31,10555.81 5377.81,10555.81 5388,10566 5388,10634 5430,10676 D3.1
NetC22_2: C22.2 R19.1 USB1.A4B9 USB1.B4A9 | length 677.7
  Top Layer w13.78: USB1.A4B9 5384.76,9243.04 5384.76,9224.73 5386.6,9222.88 5386.6,9219.59 5419.2,9187 5532.03,9187 5565.84,9220.81 5565.84,9243.04 USB1.B4A9
  Top Layer w19.68: 5465,9179 5465,9164.53 5476.53,9153 5665,9153 5694.59,9182.59 C22.2 R19.1
NetC23_1: C23.1 FPC1.18 | length 365.6
  Top Layer w10: FPC1.18@5196.73,10976.69 5196.73,10938.27 5229.31,10905.69 5395.31,10905.69 5458.26,10842.74 5458.26,10823.33 C23.1
NetC24_1: C24.1 FPC1.20 | length 339.5
  Top Layer w10: FPC1.20@5157.36,10976.69 5157.36,10938.65 5207.32,10888.69 5352.31,10888.69 5399.26,10841.74 5399.26,10827.59 5400.06,10826.8 C24.1@5404.2,10826.8
NetC25_1: C25.1 FPC1.22 | length 302.3
  Top Layer w10: FPC1.22@5117.99,10963.01 5118.5,10962.5 5118.5,10955.67 5119.4,10954.77 5119.4,10945.77 5198.29,10866.88 5316.12,10866.88 5330,10853 C25.1
NetC29_1: C29.1 R26.2 U3.4 U3.8 | length 1085.8
  Top Layer w10: U3.4 5845,10267 5871,10293 6016,10293 6029,10280 6029,9980.86 6023.14,9975 U3.8
  Top Layer w15: C29.1@5990,9872.4 5980.88,9863.28 5956.28,9863.28 5938,9845 5938,9673.59 5999.5,9612.09 5999.5,9597.09 R26.2 ; C29.1 U3.8
NetC33_1: C33.1 U4.1 X2.1 | length 199.2
  Top Layer w15: C33.1@5742.41,10474 5742.41,10524.97 5743.93,10526.5 X2.1@5758.63,10526.5 ; X2.1@5749.71,10550.71 5749.71,10552.57 5766.16,10569.03 5768.03,10569.03 5820.55,10621.55 5827.66,10621.55 5830,10623.89 U4.1
NetC34_2: C34.2 D6.2 U4.8 | length 194.7
  Top Layer w13.78: C34.2@5750,10714.59 5750.5,10715.09 D6.2@5750.5,10777.17 ; D6.2@5752,10777.17 5759.83,10785 5821.93,10785 5830,10793.07 U4.8
NetC35_2: C35.2 U4.2 X2.2 | length 167.3
  Top Layer w15: C35.2 5878,10545.04 X2.2 ; X2.2@5879.55,10552.59 U4.2@5879.55,10644.71
NetD1_2: D1.2 R11.1 | length 73.3
  Bottom Layer w10: D1.2 5791,11202.4 R11.1
NetD4_1: D4.1 R18.2 USB1.A6 USB1.B6 | length 306.2
  Top Layer w11.81: R18.2 5372.04,9384.45 5438.4,9384.45 5441.75,9381.1 5441.9,9381.1 5465.5,9357.5 5465.5,9285.04 ; USB1.A6 5465.5,9285.04 ; USB1.B6 5504.8,9284.54 5498.34,9291 5471.46,9291 5465.5,9285.04
NetD4_3: D4.3 USB1.A7 USB1.B7 | length 192.6
  Top Layer w11.81: D4.3@5416.75,9309.64 D4.3 5438.4,9309.64 5445.8,9302.25 USB1.B7 5446.19,9246.61 5446.19,9216.46 5452.65,9210 5478.25,9210 5484.71,9216.46 5484.71,9246.61 USB1.A7
NetD7_1: D7.1 D8.1 R27.1 | length 375.4
  Top Layer w15: D8.1 5893,9804 5893,9667 5942,9618 R27.1 ; D8.1@5820.74,9805 5886.74,9805 D7.1
NetD7_2: D7.2 U3.7 | length 126.3
  Top Layer w13.78: D7.2 5887.74,9876.79 5902.67,9891.72 5905.45,9891.72 5943.87,9930.13 5943.87,9973.87 U3.7
NetD8_2: D8.2 U3.6 | length 131.8
  Top Layer w13.78: D8.2 5820.74,9881.06 5895,9955.31 U3.6
NetJ1_1: J1.1 R12.2 | length 184.3
  Top Layer w10: J1.1 5008.5,9565.04 5017.28,9573.82 5055.82,9573.82 5085,9603 R12.2
NetJ1_8: J1.8 R15.2 | length 136.4
  Top Layer w10: J1.8 4705.35,9664.77 R15.2
NetJ1_9: J1.9 R17.2 | length 142.5
  Top Layer w11.02: R17.2@4642.21,9668.52 4657.89,9668.52 4660.48,9665.92 4660.48,9660.98 4662,9659.47 4662,9593 4662.05,9592.95 J1.9
NetL2_1: L2.1 U1.30 | length 152
  Top Layer w10: U1.30 4814.5,10354.54 4874,10414.04 L2.1@4874,10444
NetQ2_1: Q2.1 Q3.2 R21.1 | length 135.6
  Top Layer w15: R21.1 5133.8,9946.4 Q2.1 5181,9947.4 Q3.2
NetR5_1: R5.1 U1.26 | length 809.5
  Top Layer w10: U1.26 4893.2,10336.16 4903.04,10346 5119,10346 5165.72,10392.72 5427.97,10392.72 5485.81,10334.88 5485.81,10257.37 R5.1
NetR6_1: R6.1 U1.25 | length 722
  Top Layer w10: U1.25 4927.41,10316.6 4935,10324.19 5128.19,10324.19 5174.91,10370.91 5418.93,10370.91 5464,10325.85 5464,10248.34 5481.6,10230.74 5481.6,10214.2 R6.1
NetR7_1: R7.1 U1.10 | length 220.4
  Top Layer w10: R7.1@4743,9922.59 4794.8,9974.4 U1.10
NetR9_2: R9.2 U1.12 | length 224.3
  Top Layer w10: U1.12 4834.2,9976.2 4859,9951.4 4859,9921.59 R9.2
NetR16_2: R16.2 USB1.A5 | length 106.4
  Top Layer w11.02: R16.2 5389.58,9286 5418.54,9286 5426.1,9278.44 USB1.A5
NetR20_2: R20.2 USB1.B5 | length 84.4
  Top Layer w11.81: USB1.B5@5544.2,9262.74 5544.2,9276.63 5551.12,9283.55 5578.13,9283.55 R20.2
NetR24_2: R24.2 U4.3 | length 71.5
  Top Layer w15: U4.3@5931,10619.89 5931,10569.59 R24.2@5946,10554.59
NetR25_2: R25.2 U4.7 | length 105.7
  Top Layer w13.78: U4.7@5882,10837.04 5881.13,10837.91 5881.13,10865.42 5882,10866.29 5882,10921.81 5883.48,10923.29 5883.48,10929.89 R25.2@5891.59,10938
NetR28_1: R28.1 U3.2 | length 78.4
  Top Layer w13.78: R28.1 5944.7,10249.7 5944.7,10172.15 U3.2
PREVGH: C20.2 D5.2 FPC1.21 | length 393.9
  Top Layer w10: C20.2 5135,10819.58 v1(5135,10851) ; v1(5137,11020) 5137,10979.3 FPC1.21
  Top Layer w13: D5.2@5031,10900.5 5026.08,10895.58 5031.32,10890.34 5054.25,10890.34 C20.2
  Bottom Layer w10: v1(5135,10851) 5135,11016.44 5137,11018.44 v1(5137,11020)
PREVGL: C26.1 D2.1 FPC1.23 | length 438.7
  Top Layer w10: FPC1.23@5098.31,10976.69 5098.31,10942.82 5191.25,10849.88 5197.12,10849.88 5202.41,10844.59 5238,10844.59 C26.1 5291.14,10817.59 5297,10811.74 5297,10726 5342,10681 D2.1
RESE: FPC1.3 Q1.2 R23.2 | length 1467.5
  Top Layer w10: R23.2@5066.4,10677 5116,10677 5131,10662 Q1.2 5130,10592 5130,10483.86 5137.86,10476 5596,10476 5610.87,10461.13 5658.13,10461.13 5678,10481 5678,10882.14 5664.14,10896 5528,10896 5492.01,10931.99 FPC1.3@5492.01,10976.69
RST: C8.2 R1.2 U1.7 复位.2 | length 1984.7
  Top Layer w10: U1.7 4746,10169.3 4720.3,10169.3 4711,10160 4711,9963 4605.87,9857.87 4605.87,9829.87 4572,9796 4572,9466 4595,9443 5317,9443 复位.2 5312,9478 v1(5312,9695) ; C8.2 5216.42,9724 R1.2 5218.59,9723 v1(5253,9723)
  Bottom Layer w10: v1(5253,9723) 5284,9723 v1(5312,9695)
SPI_3V3: C28.1 Q3.1 U1.18 | length 312.7
  Top Layer w10: U1.18 5151.6,10169.8 C28.1 5180.41,10080 Q3.1
SPI_CS: J1.2 R13.1 U1.14 | length 717.5
  Top Layer w10: R13.1 4871,9646.41 4884.41,9633 4937.41,9633 4956.42,9614 4956.42,9552.17 J1.2 ; U1.14 4874,10121 4874,10017 4935,9956 v1(4935,9774)
  Bottom Layer w10: v1(4935,9774) 4935.5,9773.5 4935.5,9633.5 v1(4936,9633)
SPI_MISO: J1.7 R7.2 R14.1 | length 458.5
  Top Layer w10: R7.2@4743,9871.41 4748,9866.41 v1(4748,9772) ; J1.7 4748.83,9543.56 4748.83,9618.83 4769,9639 4769,9665.41 R14.1
  Bottom Layer w10: v1(4748,9772) 4748.5,9771.5 4748.5,9726.5 ccw(c4758.5,9726.5) 4758.5,9716.5 4759.19,9716.5 cw(c4759.19,9706.5) 4759.19,9696.5 4753.18,9696.5 ccw(c4753.18,9686.5) 4753.18,9676.5 4759.19,9676.5 cw(c4759.19,9666.5) 4759.19,9656.5 4758.5,9656.5 ccw(c4758.5,9646.5) 4748.5,9646.5 4748.5,9619.5 v1(4749,9619)
SPI_MOSI: FPC1.14 J1.3 U1.13 | length 2194.9
  Top Layer w10: U1.13 4853.8,10000.2 4909,9945 v1(4909,9853) v1(4909,9773) ; v1(4909,9611) 4909,9609.44 4921.89,9596.55 J1.3 ; v1(5272.76,11032) 5272.76,11029.91 5275.47,11027.2 FPC1.14@5275.47,10976.69
  Bottom Layer w10: v1(4909,9611) v1(4909,9773) ; v1(4909,9853) 5040,9853 5196,10009
  Bottom Layer w11.02: 5196,10009 5274.59,10087.59 5274.59,10540.95 5274.59,10546.46 ccw(c5263.56,10546.46) 5263.56,10557.48 5256.29,10557.48 cw(c5256.29,10568) 5256.29,10578.51 5265.56,10578.51 ccw(c5265.56,10589.02) 5265.56,10599.53 5256.29,10599.53 cw(c5256.29,10610.04) 5256.29,10620.56 5265.56,10620.56 ccw(c5265.56,10631.07) 5265.56,10641.58 5256.29,10641.58 cw(c5256.29,10652.09) 5256.29,10662.6 5263.56,10662.6 ccw(c5263.56,10673.63) 5274.59,10673.63 5274.59,10723.7 5274.59,11025.44 5274.04,11025.99 5274.04,11030.72 v1(5272.76,11032)
SPI_SCLK: FPC1.13 J1.5 R9.1 | length 1985.7
  Top Layer w10: v1(4835,9612) 4835.14,9611.86 4835.14,9543.52 J1.5 ; v1@4869,9800 R9.1
  Top Layer w11.02: v1@5292,11049 v1(5292,11047.19) 5295.1,11044.09 FPC1.13@5295.1,10976.69
  Bottom Layer w10: v1(4835,9612) 4869,9646 4869,9662.04 4869,9667.04 ccw(c4859,9667.04) 4859,9677.04 4858.67,9677.04 cw(c4858.67,9687.04) 4858.67,9697.04 4861.35,9697.04 ccw(c4861.35,9707.04) 4861.35,9717.04 4858.67,9717.04 cw(c4858.67,9727.04) 4858.67,9737.04 4859,9737.04 ccw(c4859,9747.04) 4869,9747.04 4869,9780.8 v1@4869,9801.4 ; v1(4867.69,9802.22) 4895.47,9830 5044.68,9830
  Bottom Layer w11.02: 5044.68,9830 5061,9830 5302,10071 5302,11037.19 v1(5292,11047.19) v1@5292,11049
USB_D+: D4.6 R5.2 | length 914.1
  Top Layer w10: R5.2 5527,10145 5521.27,10145 5515.41,10139.14 5515.41,10060.33 5421.99,9966.91 5421.99,9483.3 5501.41,9403.88 5501.41,9373.56 5507.26,9367.7 5515.55,9367.7 5522.89,9375.05 5522.89,9380.59 5526.75,9384.45 D4.6
USB_D-: D4.4 R6.2 | length 1015.6
  Top Layer w10: R6.2 5484,10145.41 5489.56,10145.41 5495.41,10139.55 5495.41,10068.62 5492.17,10065.37 5477.75,10050.95 cw(c5470.68,10058.03) 5463.61,10050.95 5462.76,10051.81 ccw(c5455.69,10044.74) 5448.62,10051.81 ccw(c5455.69,10044.74) 5448.62,10037.67 5451.59,10034.69 cw(c5444.52,10027.62) 5451.59,10020.55 cw(c5444.52,10027.62) 5437.45,10020.55 5434.47,10023.52 ccw(c5427.4,10016.45) 5420.33,10023.52 ccw(c5427.4,10016.45) 5420.33,10009.38 5421.18,10008.53 cw(c5414.11,10001.46) 5421.18,9994.39 5417.65,9990.85 5401.99,9975.19 5401.99,9475.01 5481.41,9395.59 5481.41,9357.59 5522.89,9316.11 5522.89,9313.5 5526.75,9309.64 D4.4
VCOM: C27.1 FPC1.24 | length 210
  Top Layer w10: FPC1.24@5078.62,10976.69 5078.62,10936.97 C27.1
VOUT: C32.2 R26.1 R27.2 SW5.2 U2.2 | length 387.8
  Top Layer w19.68: C32.2 5902.6,9207.5 5931,9235.9 U2.2@5931,9335 ; SW5.2 5904.5,9174.91 ; U2.2@5931,9433 5931,9526.42 R27.2 R26.1@6006.01,9537.41
pads on no net: FPC1.1 FPC1.4 FPC1.6 FPC1.7 FPC1.19 J1.0 SW5.3 U1.21 U1.22 U1.23 U1.24 U3.10 U3.11 U5.1 U5.6 U6.1 U6.4 U6.5 U6.6 U6.11 USB1.A8 USB1.B8

## Polygon pours and split planes (outlines as drawn)
BAT- on Top Layer "BAT-_L01_P008" (hatched Horizontal grid 8 track 19.68, remove dead copper, pour order 8): 4535,10762 4802,10762 4802,11319 6080,11319 6080,8893 6084,8889 4545,8889 4535,8899
3V3 on Top Layer "3V3_L01_P000" (hatched Horizontal grid 8 track 16, pour order 0): 5812,9424.42 5812,9560 5884,9560 5884,9424.42
BAT+ on Top Layer "NONET_L-01_P-001" (hatched 90Degree grid 20 track 19.68, remove dead copper, pour order 1): 5845,10027.5 5653,10027.5 5653,9819 5771,9819 5771,9912 5799,9940 5845,9940
3V3 on Top Layer "3V3_L01_P003" (hatched Horizontal grid 8 track 8, remove dead copper, pour order 3): 4793.2,10354 4793.2,10303.8 4773.6,10303.8 4773.6,10354
3V3 on Top Layer "3V3_L01_P004" (hatched Horizontal grid 8 track 8, remove dead copper, pour order 4): 4712,10267.2 4759.3,10267.2 4759.3,10247.6 4712,10247.6
BAT- on Bottom Layer "BAT-_L02_P007" (hatched Horizontal grid 8 track 19.68, remove dead copper, pour order 7): 4535,10762 4806,10762 4806,11319 6080,11319 6080,8893 6084,8889 4545,8889 4535,8899

## Keep-outs
Keep-Out Layer:
  the board outline again, w0.5

## Other copper
Top Layer:
  rectangle net BAT-: 4803.94,10754 4842.94,10843.07
  rectangle net BAT-: 4803.98,10911 4892,11298
  rectangle net E3V3: 5236.1,10956 5255.79,11002.6
  pour cut-out: 4555.83,11310.08 4867,11310.08 4867,10762 4555.83,10762
Bottom Layer:
  rectangle net BAT-: 4803.94,10754 4897,10926
  rectangle net BAT-: 4803.98,10911 4892,11298
  pour cut-out: 4555.83,11310.08 4867.07,11310.08 4867.07,10762 4555.83,10762

## Silkscreen, mask and mechanical layers (free items; w line width, h text height)
Top Overlay:
  text "BAT+" at 5542,9867 h30
  text "BAT-" at 5542,9679 h30
Bottom Overlay:
  lines w5: 4803.67,9614.41 4803.67,11153.78 5803.67,11153.78 5803.67,9614.41 4803.67,9614.41
Top Solder:
  rectangle: 4555.83,10762 4800,11310.08
Mechanical 1:
  lines w0.5: 4772.36,9264.02 5008.58,9264.02 5008.58,9500.24 4772.36,9500.24 4772.36,9264.02 ; 5185.75,9264.02 5421.97,9264.02 5421.97,9500.24 5185.75,9500.24 5185.75,9264.02 ; 5599.13,9264.02 5835.35,9264.02 5835.35,9500.24 5599.13,9500.24 5599.13,9264.02

## Dimensions
4555.83,11310.08 to 4555.83,8949.06 on Top Overlay
4555.83,11310.08 to 6051.89,11311.26 on Top Overlay

## Text inside footprints (layer, text, board x,y; h text height)
J1: Top Overlay "k" at 4652.52,9455 h30; Top Overlay "8" at 4702.5,9455 h30; Top Overlay "7" at 4746.5,9455 h30; Top Overlay "6" at 4788.5,9455 h30; Top Overlay "5" at 4830.5,9455 h30; Top Overlay "4" at 4872.5,9455 h30; Top Overlay "3" at 4919.5,9455 h30; Top Overlay "2" at 4961.5,9455 h30; Top Overlay "1" at 5004.5,9455 h30
WIFI/BLE: Mechanical 13 "GND" at 4868.49,11241.56 h30 r90